# Altium PCB PCB_interface.PcbDoc
Units mm, origin at the board's own origin, x right, y up, seen from the top; angles counter-clockwise.
Board outline 31 x 45 mm, 2 copper layers (Top Layer, Bottom Layer); 8 components, 3 nets, 16 pads, 152 vias.
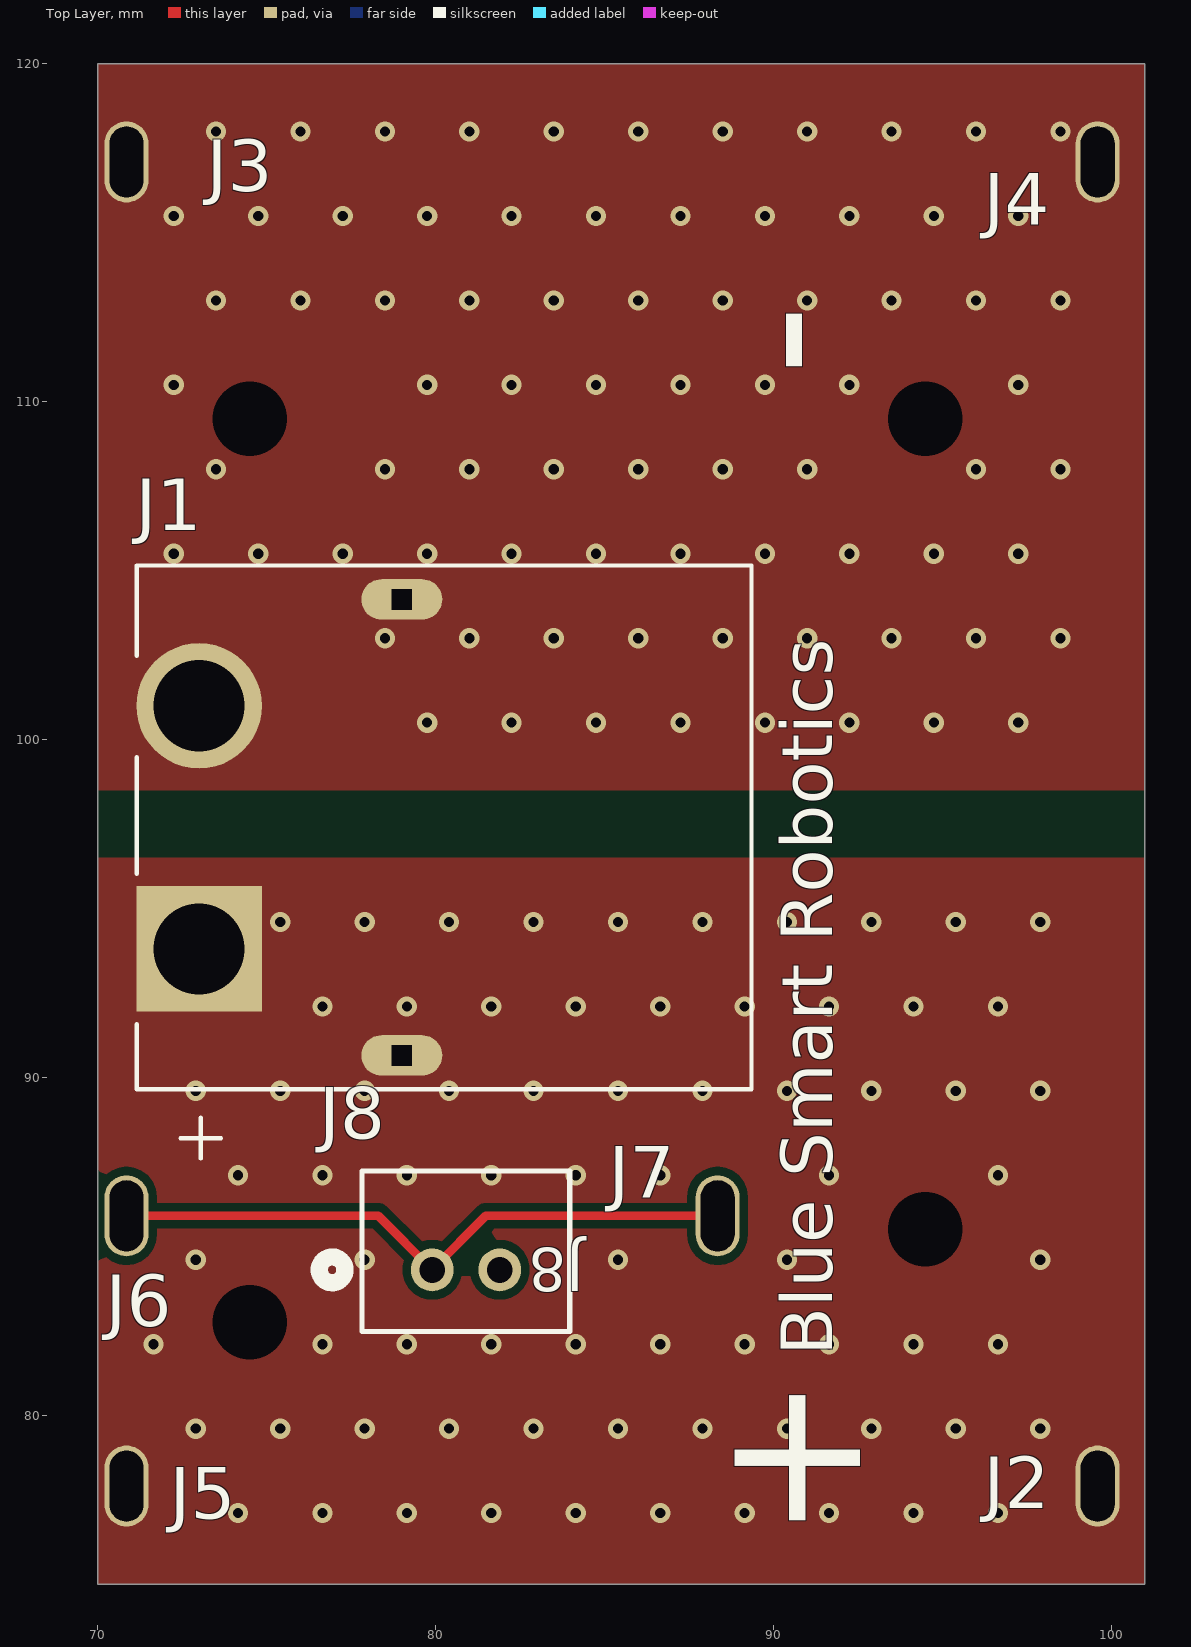
[diagram p0: Top Layer view]
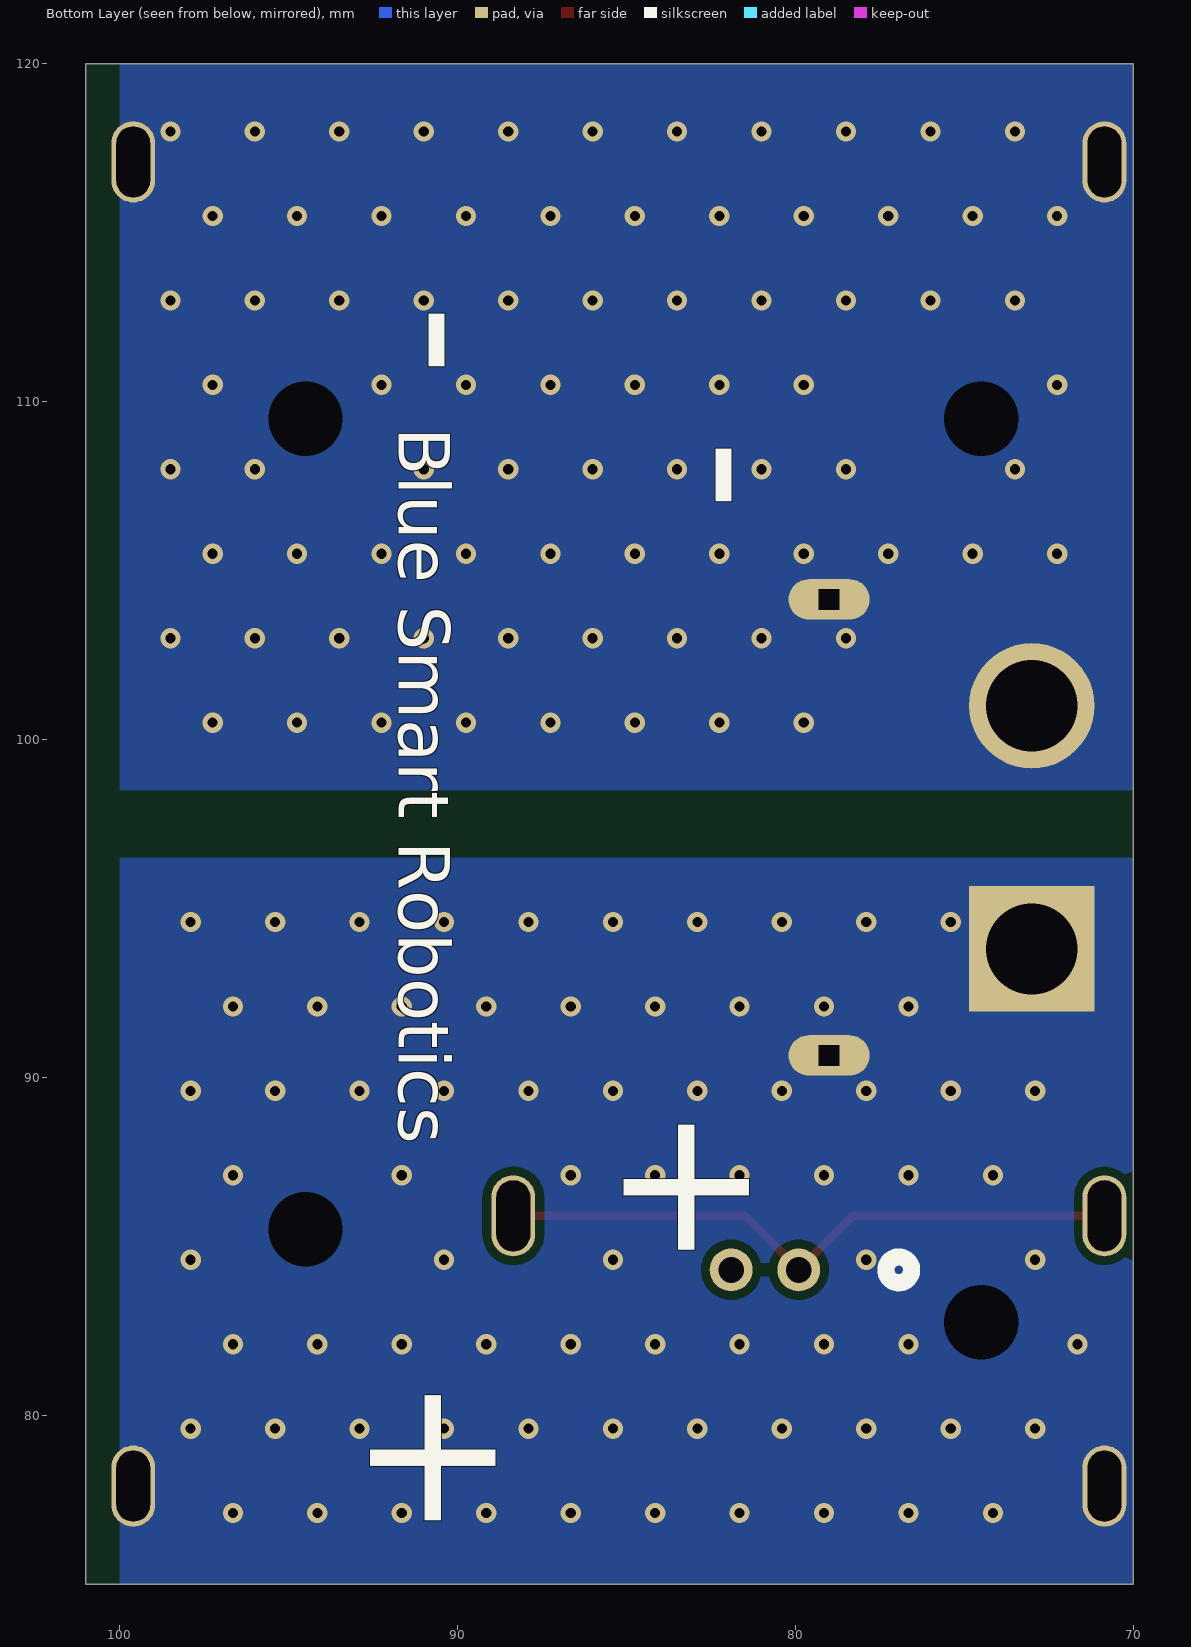
[diagram p1: Bottom Layer view, seen from below]

## Layer stack, top to bottom
Top Solder: solder mask 0.0102, Solder Resist, Dk 3.5
Top Layer: signal copper 0.0356
Dielectric 1: dielectric 0.32, FR-4, Dk 4.8
Bottom Layer: signal copper 0.0356
Bottom Solder: solder mask 0.0102, Solder Resist, Dk 3.5

## Board outline
70,75 101,75 101,120 70,120

## Design rules (kind name [scope] priority, off if disabled: settings)
Clearance [All] p1: gap=0.254 ignorepadtopadclearanceinfootprint=FALSE
PolygonConnect [All] p1: connectstyle=Direct reliefconductorwidth=0.254 reliefentries=4 polygonreliefangle="90 Angle" airgapwidth=0.254
RoutingVias [All] p1: holewidth=0.711 width=1.27 viastyle="Through Hole" minholewidth=0.711 minwidth=1.27 maxholewidth=0.711 maxwidth=1.27
SolderMaskExpansion [All] p1: expansion=0 istentingtop=FALSE
SupplyNets "Schematic Supply Nets_1" [InNet('GND')] p1: voltage=0.000
SupplyNets "Schematic Supply Nets" [InNet('Bat+')] p2: voltage=0.000
Width [All] p1: maxlimit=0.254 minlimit=0.254 preferedwidth=0.254
30 further rules are at their usual default settings.

## Components (designator, comment, footprint, x,y, rotation, side; value= is the part's Value field where it differs from the comment)
J1 "XT60PW-M" AMASS_XT60PW-M 79,97.4 r90 top
J2 "Solder Pad 3mm" Solder_Pad_3mm#1 105,77.5 r0 top
J3 "Solder Pad 3mm" Solder_Pad_3mm#2 105,112.5 r0 top
J4 "Solder Pad 3mm" Solder_Pad_3mm#3 103.5,76 r0 top
J5 "Solder Pad 3mm" Solder_Pad_3mm#4 70.85,77.9 r90 top
J6 "Solder Pad 3mm" Solder_Pad_3mm#5 108,85.9 r90 top
J7 "Solder Pad 3mm" Solder_Pad_3mm#6 70.85,76 r90 top
J8 "B2B-PH-K-S" CONN2_B2B-PH-K-S_JST 79.9,84.3 r180 top

## Footprints (in the part's own frame and the unit in brackets; to place one, negate y for a bottom-side part, rotate by r counter-clockwise, add the part's x,y. Pads: shape width x height; smd on the part's side, far side on the other; paste and mask are expansions set on the pad)
AMASS_XT60PW-M [mm]
  rect 3.716x3.716 / inner round 3.716 / far side rect 3.716x3.716 hole 2.7 mask+0.102: 1(-3.6,6)
  round 3.716 hole 2.7 mask+0.102: 2(3.6,6)
  oval 1.2x2.4 hole 0.6 square mask+0.102: SH1(-6.75,0) SH2(6.75,0)
  silkscreen extent -9.8,-10.35 7.75,7.85, body extent -7.75,-10.35 7.75,7.85, height 8.4
CONN2_B2B-PH-K-S_JST [mil]
  round 50 hole 30 paste-99999 mask+0: 1(0,0) 2(-78.74,0)
  silkscreen extent -160,-115 132,72, body extent -157,-109 75,69, height 236
Solder_Pad_3mm#1 [mm] "Solder_Pad_3mm"
  oval 1.3x2.4 hole 1 slot 2.1 at 90 deg: 1(-5.4,0.4)
Solder_Pad_3mm#2 [mm] "Solder_Pad_3mm"
  oval 1.3x2.4 hole 1 slot 2.1 at 90 deg: 1(-34.15,4.6)
Solder_Pad_3mm#3 [mm] "Solder_Pad_3mm"
  oval 1.3x2.4 hole 1 slot 2.1 at 90 deg: 1(-3.9,41.1)
Solder_Pad_3mm#4 [mm] "Solder_Pad_3mm"
  oval 2.4x1.3 hole 1 slot 2.1 at 0 deg: 1(0,0)
Solder_Pad_3mm#5 [mm] "Solder_Pad_3mm"
  oval 2.4x1.3 hole 1 slot 2.1 at 0 deg: 1(0,37.15)
Solder_Pad_3mm#6 [mm] "Solder_Pad_3mm"
  oval 2.4x1.3 hole 1 slot 2.1 at 0 deg: 1(9.9,-17.5)

## Part data
J1: "Socket, DC supply, male, PIN: 2", Package=Package, Check_prices=https://www.snapeda.com/parts/XT60PW-M/AMASS/view-part/?ref=eda, MF=AMASS, MP=XT60PW-M, SnapEDA_Link=https://www.snapeda.com/parts/XT60PW-M/AMASS/view-part/?ref=snap
J2 J3 J4 J5 J6 J7: library part Solder_Pad, Exclude from BOM=True
J8: "Description", Manufacturer_Name=JST, Copyright="Copyright (C) 2026 Ultra Librarian. All rights reserved.", Manufacturer_Part_Number=B2B-PH-K-S, RefDes=RefDes, Type=Type

## Free pads (board coordinates)
  round 0 hole 2.2 unplated: 6(74.5,82.75) 6(74.5,109.5) 6(94.5,85.5) 6(94.5,109.5)

## Via types
v1: diameter 0.6, hole 0.3, Top Layer to Bottom Layer, 152 vias

## Nets (pads, with @x,y where several pads share a name; then routed paths per layer and width w, separated by ;. In a path a pad name is that pad's centre, name@x,y a point inside that pad or via, vN(x,y) a via of type N, cw(c..) or ccw(c..) an arc to the next point about the centre after c; other vN are vias at no path point)
Bat+: J1.1 J1.SH1 J2.1 J5.1 pad.6@74.5,82.75 pad.6@94.5,85.5
  other v1: 74.15,77.1 76.65,77.1 79.15,77.1 81.65,77.1 84.15,77.1 86.65,77.1 89.15,77.1 91.65,77.1 94.15,77.1 96.65,77.1 72.9,79.6 75.4,79.6 77.9,79.6 80.4,79.6 82.9,79.6 85.4,79.6 87.9,79.6 90.4,79.6 92.9,79.6 95.4,79.6 97.9,79.6 71.65,82.1 76.65,82.1 79.15,82.1 81.65,82.1 84.15,82.1 86.65,82.1 89.15,82.1 91.65,82.1 94.15,82.1 96.65,82.1 72.9,84.6 77.9,84.6 85.4,84.6 90.4,84.6 97.9,84.6 74.15,87.1 76.65,87.1 79.15,87.1 81.65,87.1 84.15,87.1 86.65,87.1 91.65,87.1 96.65,87.1 72.9,89.6 75.4,89.6 77.9,89.6 80.4,89.6 82.9,89.6 85.4,89.6 87.9,89.6 90.4,89.6 92.9,89.6 95.4,89.6 97.9,89.6 76.65,92.1 79.15,92.1 81.65,92.1 84.15,92.1 86.65,92.1 89.15,92.1 91.65,92.1 94.15,92.1 96.65,92.1 75.4,94.6 77.9,94.6 80.4,94.6 82.9,94.6 85.4,94.6 87.9,94.6 90.4,94.6 92.9,94.6 95.4,94.6 97.9,94.6
GND: J1.2 J1.SH2 J3.1 J4.1 pad.6@74.5,109.5 pad.6@94.5,109.5
  other v1: 79.75,100.5 82.25,100.5 84.75,100.5 87.25,100.5 89.75,100.5 92.25,100.5 94.75,100.5 97.25,100.5 78.5,103 81,103 83.5,103 86,103 88.5,103 91,103 93.5,103 96,103 98.5,103 72.25,105.5 74.75,105.5 77.25,105.5 79.75,105.5 82.25,105.5 84.75,105.5 87.25,105.5 89.75,105.5 92.25,105.5 94.75,105.5 97.25,105.5 73.5,108 78.5,108 81,108 83.5,108 86,108 88.5,108 91,108 96,108 98.5,108 72.25,110.5 79.75,110.5 82.25,110.5 84.75,110.5 87.25,110.5 89.75,110.5 92.25,110.5 97.25,110.5 73.5,113 76,113 78.5,113 81,113 83.5,113 86,113 88.5,113 91,113 93.5,113 96,113 98.5,113 72.25,115.5 74.75,115.5 77.25,115.5 79.75,115.5 82.25,115.5 84.75,115.5 87.25,115.5 89.75,115.5 92.25,115.5 94.75,115.5 97.25,115.5 73.5,118 76,118 78.5,118 81,118 83.5,118 86,118 88.5,118 91,118 93.5,118 96,118 98.5,118
ID: J6.1 J7.1 J8.1 | length 18.8
  Top Layer w0.254: J6.1 78.3,85.9 J8.1 79.9,84.313 81.487,85.9 J7.1
pads on no net: J8.2

## Polygon pours and split planes (outlines as drawn)
Bat+ on Top Layer "BAT+_L01_P003" (solid, pour order 3): 70,96.5 101,96.5 101,75 70,75
GND on Top Layer "GND_L01_P000" (solid, pour order 0): 70,120 101,120 101,98.5 70,98.5
Bat+ on Bottom Layer "BAT+_L02_P002" (solid, pour order 2): 70,75 70,96.5 100,96.5 100,75
GND on Bottom Layer "GND_L02_P001" (solid, pour order 1): 70,120 100,120 100,98.5 70,98.5

## Silkscreen, mask and mechanical layers (free items; w line width, h text height)
Top Overlay:
  text "-" at 92.245,110.754 h8 r90
  text "Blue Smart Robotics" at 91.746,81.754 h1.52 r90
  text "+" at 92.579,76.254 h8 r90
Bottom Overlay:
  text "-" at 92.245,110.754 h8 r90
  text "Blue Smart Robotics" at 91.746,109.246 h1.52 r90
  text "-" at 83.745,106.754 h8 r90
  text "+" at 85.079,84.254 h8 r90
  text "+" at 92.579,76.254 h8 r90
Top Solder:
  region: 100,98.375 94,98.375 94,106.5 100,106.5
  region: 94,96.5 94,88 100,88 100,96.5
Mechanical 1:
  lines w0.254: 67.092,76.376 67.6,77.9 ; 67.092,87.424 67.6,85.9 ; 67.346,77.9 67.854,77.9 ; 67.346,85.9 67.854,85.9 ; 67.6,75.36 67.6,77.9 ; 67.6,88.44 67.6,85.9 ; 68.108,76.376 67.6,77.9 ; 68.108,87.424 67.6,85.9 ; 70,75 101,75 101,120 70,120 70,75
  text "8 (mm)" at 71.257,77.812 h1.52 r90
Mechanical 13:
  lines w0.254: 67.46,75 70,75 ; 67.46,120 70,120 ; 68.476,74.492 70,75 ; 68.476,75.508 70,75 ; 68.476,119.492 70,120 ; 68.476,120.508 70,120 ; 69.492,79.424 70,77.9 ; 69.492,87.024 70,85.5 ; 69.492,107.976 70,109.5 ; 69.492,121.524 70,120 ; 69.746,77.9 70.254,77.9 ; 69.746,85.5 70.254,85.5 ; 69.746,109.5 70.254,109.5 ; 69.746,120 70.254,120 ; 70,74.746 70,75.254 ; 70,80.44 70,77.9 ; 70,88.04 70,85.5 ; 70,106.96 70,109.5 ; 70,119.746 70,120.254 ; 70,122.54 70,120 ; 70.508,79.424 70,77.9 ; 70.508,87.024 70,85.5 ; 70.508,107.976 70,109.5 ; 70.508,121.524 70,120 ; 73.71,75 71.17,75 ; 74.5,119.746 74.5,120.254 ; 75.5,119.746 75.5,120.254 ; 76.024,119.492 74.5,120 ; 76.024,120.508 74.5,120 ; 77.024,119.492 75.5,120 ; 77.024,120.508 75.5,120 ; 78.04,120 75.5,120 ; 79.396,120 74.5,120 ; 80.566,75 71.17,75 ; 89.604,120 94.5,120 ; 90.774,75 100.17,75 ; 91.96,120 94.5,120 ; 98.646,74.492 100.17,75 ; 98.646,75.508 100.17,75 ; 100,119.746 100,120.254 ; 100.17,74.746 100.17,75.254 ; 101.524,119.492 100,120 ; 101.524,120.508 100,120 ; 102.54,120 100,120 ; 70,75 70.508,73.476 70,75 ; 70,75 69.492,73.476 70,75 ; 70,75 70,72.46 70,75 ; 71.17,75 72.694,74.492 71.17,75 ; 71.17,75 72.694,75.508 71.17,75 ; 94.5,120 92.976,119.492 94.5,120 ; 94.5,120 92.976,120.508 94.5,120 ; 69.746,75 70.254,75 69.746,75 ; 71.17,74.746 71.17,75.254 71.17,74.746 ; 94.5,119.746 94.5,120.254 94.5,119.746
  text "20 (mm)" at 79.65,119.086 h1.52
  text "5.5 (mm)" at 67.265,116.343 h1.52
  text "5.5 (mm)" at 91.765,116.343 h1.52
  text "10.5 (mm)" at 73.657,108.631 h1.52 r90
  text "10.5 (mm)" at 73.657,74.131 h1.52 r90
  text "29 (mm)" at 80.82,74.086 h1.52
  text "1.17 (mm)" at 64.592,71.343 h1.52
  text "2.9 (mm)" at 73.657,70.965 h1.52 r90

## Dimensions
70,70.5 to 100,70 on Mechanical 13